# Altium PCB Karta_TETRA.PCBDOC (part 8 of 8)
Units mm, origin at the board's own origin, x right, y up, seen from the top; angles counter-clockwise.
Board outline 70 x 83.2 mm, 6 copper layers (TopLayer, Layer 1, Layer 2, Layer 3, Layer 4, Bottom Layer), stack 0.914 mm thick; 344 components, 222 nets, 1133 pads, 615 vias.
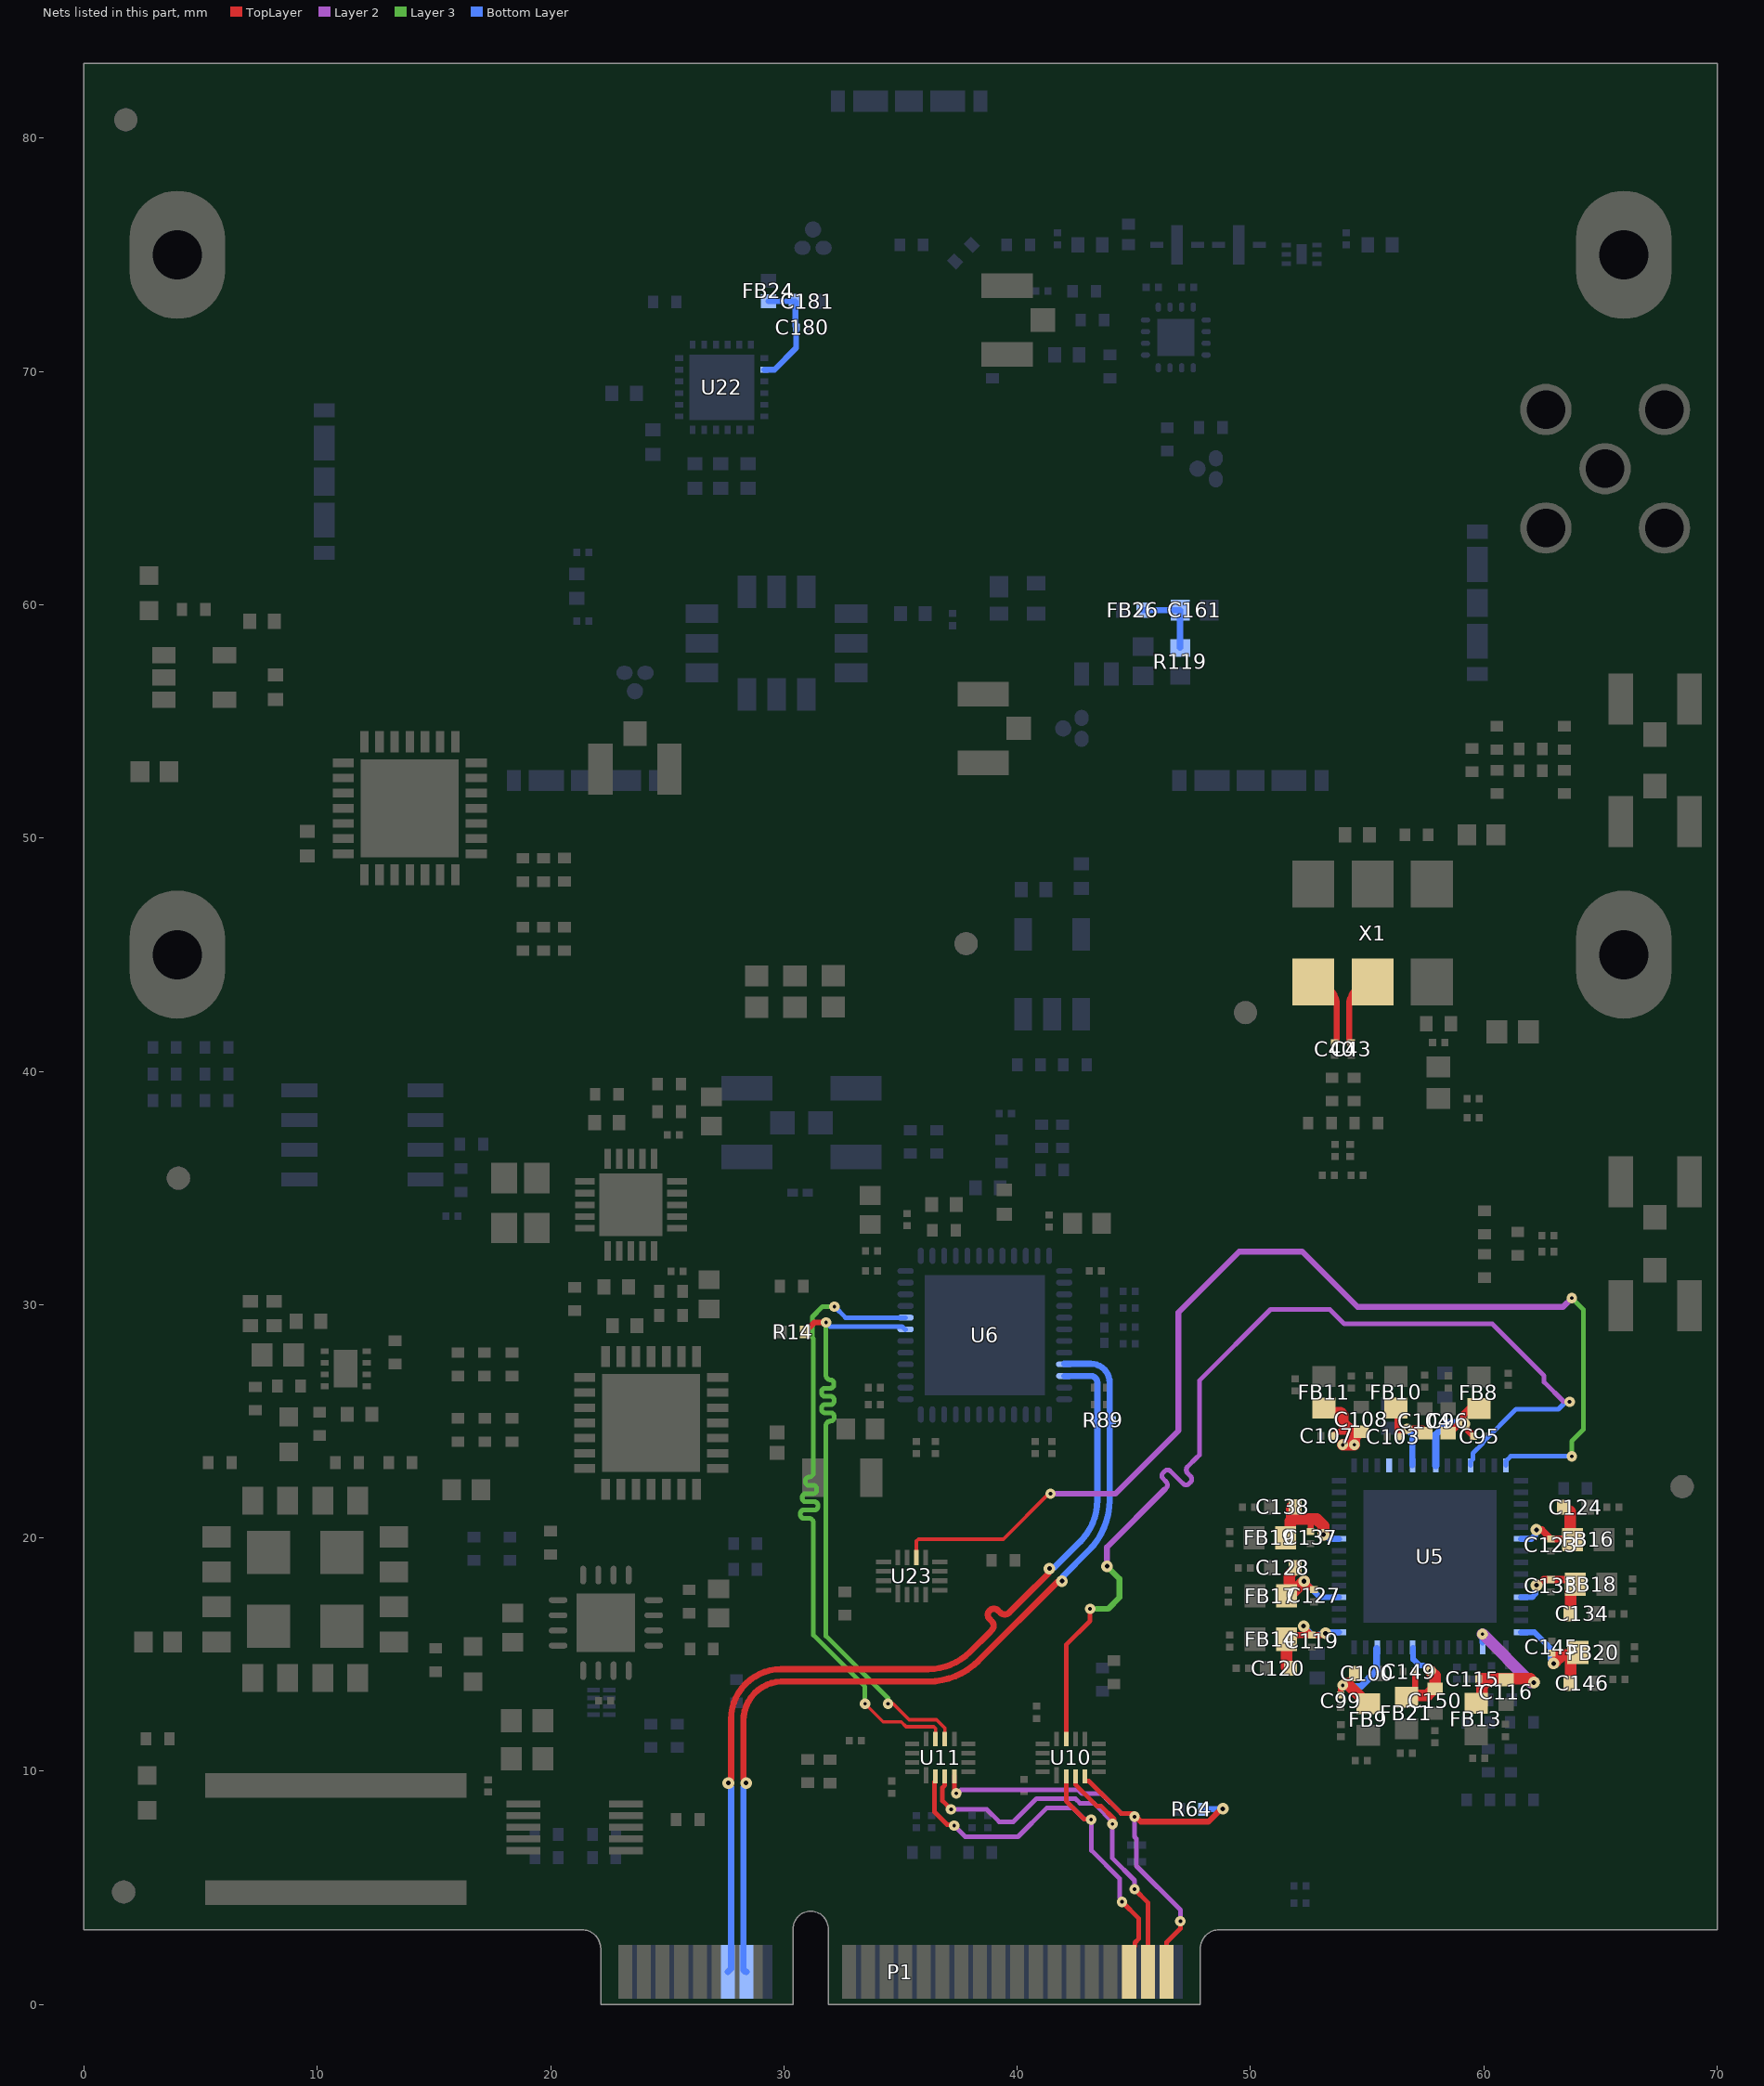
[diagram p9: the nets of this part, all layers, seen from the top]

## Via types
v1: diameter 0.5, hole 0.2, TopLayer to Bottom Layer, tented both sides, 402 vias
v2: diameter 0.45, hole 0.15, TopLayer to Bottom Layer, tented both sides, 189 vias
v3: diameter 0.45, hole 0.15, TopLayer to Bottom Layer, 23 vias
v4: diameter 0.5, hole 0.2, TopLayer to Bottom Layer, 1 vias

## Nets (pads, with @x,y where several pads share a name; then routed paths per layer and width w, separated by ;. In a path a pad name is that pad's centre, name@x,y a point inside that pad or via, vN(x,y) a via of type N, cw(c..) or ccw(c..) an arc to the next point about the centre after c; other vN are vias at no path point) (continued)
SPI_MISO_LTC: R14.1 U6.43 U11.10 | length 27.4
  TopLayer w0.15: v3(34.463,12.892) 34.679,12.892 35.367,12.204 36.545,12.204 36.9,11.849 U11.10@36.9,11.379
  TopLayer w0.25: R14.1@30.899,28.832 31.304,29.237 v2(31.804,29.237)
  Layer 3 w0.2: v2(31.804,29.237) 31.803,28.241 31.803,26.972 ccw(c32.003,26.972) 32.003,26.772 cw(c32.003,26.631) 32.144,26.631 32.144,26.561 cw(c32.003,26.561) 32.003,26.42 31.761,26.42 ccw(c31.761,26.279) 31.62,26.279 31.62,26.208 ccw(c31.761,26.208) 31.761,26.067 32.011,26.067 cw(c32.011,25.926) 32.152,25.926 32.152,25.856 cw(c32.011,25.856) 32.011,25.715 31.759,25.715 ccw(c31.759,25.574) 31.618,25.574 31.618,25.503 ccw(c31.759,25.503) 31.759,25.362 32.011,25.362 cw(c32.011,25.221) 32.152,25.221 32.152,25.151 cw(c32.011,25.151) 32.011,25.01 32.003,25.01 ccw(c32.003,24.81) 31.803,24.81 31.803,24.358 31.803,15.792 34.463,13.131 v3(34.463,12.892)
  Bottom Layer w0.2: v2(31.804,29.237) 31.974,29.067 35.064,29.067 35.203,28.928 U6.43@35.217,28.942
SPI_MISO_MB: P1.49 U10.3 U11.3 | length 19.6
  TopLayer w0.2: U11.3@36.9,9.779 36.9,9.392 36.8,9.292 36.8,8.731 v2(37.165,8.366) ; U10.3@42.495,9.779 42.495,9.425 43.408,8.513 43.589,8.513 44.153,7.949 44.081,7.877 v3(44.081,7.742) ; v2(45.027,4.946) 45.6,4.373 P1.49@45.6,1.4
  Layer 2 w0.2: v2(37.165,8.366) 38.694,8.366 39.224,7.835 39.833,7.835 40.823,8.826 42.492,8.826 42.686,8.632 43.293,8.632 44.153,7.772 44.122,7.742 v3(44.081,7.742) 44.081,6.268 45.027,5.323 v2(45.027,4.946)
SPI_MOSI_LMK: U5.11 U10.11 | length 45
  TopLayer w0.2: U10.11@42.095,11.379 42.095,15.419 43.124,16.447 v3(43.124,16.962)
  Layer 2 w0.2: v3@43.068,16.962 v3(43.124,16.962) ; 46.309,22.059 46.38,22.13 ccw(c46.238,22.271) 46.38,22.413 46.255,22.537 cw(c46.384,22.665) 46.255,22.794 46.32,22.858 cw(c46.448,22.73) 46.576,22.858 47.108,22.326 ccw(c47.237,22.455) 47.365,22.326 47.429,22.39 ccw(c47.301,22.519) 47.429,22.647 47.305,22.772 cw(c47.446,22.913) 47.305,23.055 47.676,23.426 47.806,23.556 47.806,26.74 50.858,29.792 53.4,29.792 54.022,29.17 60.369,29.17 62.586,26.953 62.586,26.68 63.435,25.832 v3(63.678,25.832)
  Layer 2 w0.25: v1(43.848,18.787) 43.848,19.603 46.304,22.059 46.309,22.059
  Layer 3 w0.25: v3(43.124,16.962) 43.899,16.962 44.384,17.448 44.384,18.25 v1(43.848,18.787)
  Bottom Layer w0.2: U5.11@59.443,23.106 59.443,23.286 59.529,23.373 59.529,23.627 59.96,24.058 59.96,24.099 61.38,25.519 63.198,25.519 63.511,25.832 v3(63.678,25.832)
SPI_MOSI_LTC: U6.44 U11.11 | length 28.4
  TopLayer w0.15: v3(33.477,12.892) 34.251,12.117 35.029,12.117 35.242,11.904 36.42,11.904 36.5,11.824 U11.11@36.5,11.379
  Layer 3 w0.2: v2(32.168,29.912) 31.65,29.912 31.219,29.48 31.219,28.589 31.268,28.54 31.268,24.104 31.268,22.806 cw(c31.068,22.806) 31.068,22.606 ccw(c31.068,22.465) 30.927,22.465 30.927,22.394 ccw(c31.068,22.394) 31.068,22.253 31.268,22.253 cw(c31.268,22.112) 31.409,22.112 31.409,22.042 cw(c31.268,22.042) 31.268,21.901 30.932,21.901 ccw(c30.932,21.76) 30.791,21.76 30.791,21.689 ccw(c30.932,21.689) 30.932,21.548 31.312,21.548 cw(c31.312,21.407) 31.453,21.407 31.453,21.337 cw(c31.312,21.337) 31.312,21.196 30.852,21.196 ccw(c30.852,21.055) 30.711,21.055 30.711,20.985 ccw(c30.852,20.985) 30.852,20.844 31.068,20.844 cw(c31.068,20.644) 31.268,20.644 31.268,20.544 31.268,15.832 33.477,13.623 v3(33.477,12.892)
  Bottom Layer w0.2: v2(32.168,29.912) 32.174,29.912 32.643,29.442 U6.44@35.217,29.442
SPI_MOSI_MB: P1.47 U10.2 U11.2 | length 19.4
  TopLayer w0.2: U11.2@36.5,9.779 36.5,9.579 36.45,9.529 36.45,8.254 36.987,7.716 37.251,7.716 v2(37.299,7.668) ; U10.2@42.095,9.779 42.095,8.728 42.873,7.95 43.148,7.95 v3(43.17,7.928) ; v2(44.494,4.402) 45.216,3.68 45.216,2.82 45.05,2.654 45.05,2.5 44.8,2.25 P1.47@44.8,1.4
  Layer 2 w0.2: v2(37.299,7.668) 37.776,7.191 40.033,7.191 41.261,8.419 42.404,8.419 42.873,7.95 43.066,7.95 43.089,7.928 v3(43.17,7.928) ; v3@43.183,7.95 43.183,6.601 44.384,5.4 44.384,4.566 44.494,4.456 v2(44.494,4.402)
SPI_nCS_1_MB: P1.51 R64.2 U10.4 U11.4 | length 24.6
  TopLayer w0.2: U11.4@37.3,9.779 37.3,9.173 37.385,9.088 v2(37.385,9.049) ; U10.4@42.895,9.779 42.895,9.579 43.072,9.579 44.46,8.191 44.888,8.191 v3(45.027,8.052) ; P1.51@46.4,1.4 46.4,2.665 46.995,3.26 v2(46.995,3.569)
  TopLayer w0.25: v3(45.027,8.052) 45.081,8.052 45.298,7.835 48.197,7.835 48.751,8.39 v1(48.815,8.39)
  Layer 2 w0.2: v2(37.385,9.049) 37.453,9.049 37.595,9.192 42.621,9.192 42.777,9.036 43.615,9.036 44.46,8.191 44.888,8.191 v3(45.027,8.052) 45.027,7.191 45.11,7.107 45.11,5.939 46.995,4.054 v2(46.995,3.569)
  Bottom Layer w0.25: R64.2@47.981,8.366 47.993,8.378 48.802,8.378 v1(48.815,8.39)
Sync_04610: U5.14 U23.10 | length 48.3
  TopLayer w0.15: U23.10@35.677,19.164 35.677,19.861 35.765,19.949 39.407,19.949 41.349,21.892 v2(41.431,21.892)
  Layer 2 w0.25: v2(41.431,21.892) 44.206,21.892 46.912,24.598 46.912,29.67 49.516,32.273 52.216,32.273 54.588,29.902 63.394,29.902 v2(63.775,30.282)
  Layer 3 w0.2: v2(63.775,23.499) 63.775,24.151 64.263,24.639 64.263,29.795 v2(63.775,30.282)
  Bottom Layer w0.2: U5.14@60.943,23.106 60.943,23.286 61.156,23.499 v2(63.775,23.499)
SYNC_N: P1.12 R89.1 U6.22 | length 38.9
  TopLayer w0.268: v1(27.62,9.491) 27.62,9.554 27.736,9.67 27.736,12.231 cw(c29.878,12.231) 29.878,14.373 36.181,14.373 ccw(c36.181,16.913) 37.977,15.117 38.815,15.954 38.909,16.049 ccw(c38.72,16.238) 38.909,16.428 38.817,16.52 cw(c39.002,16.705) 38.817,16.889 cw(c39.002,16.705) 39.186,16.889 39.279,16.797 ccw(c39.468,16.987) 39.658,16.797 40.26,17.4 41.337,18.476 41.337,18.64 v1(41.381,18.685)
  Bottom Layer w0.268: P1.12@27.6,1.4 27.736,1.536 27.736,9.312 27.62,9.428 v1(27.62,9.491) ; v1(41.381,18.685) 41.425,18.729 41.589,18.729 42.689,19.829 ccw(c40.893,21.625) 43.433,21.625 43.433,26.66 ccw(c43.153,26.66) 43.153,26.941 U6.22@42.017,26.942
SYNC_P: P1.14 R89.2 U6.21 | length 38.8
  TopLayer w0.268: v1(28.38,9.491) 28.38,9.554 28.264,9.67 28.264,12.165 cw(c29.945,12.165) 29.887,13.845 36.184,13.845 ccw(c36.184,16.906) 38.349,14.741 41.71,18.103 41.874,18.103 v1(41.918,18.147)
  Bottom Layer w0.268: v1(28.38,9.491) 28.38,9.428 28.264,9.312 28.264,1.536 ccw(c28.4,1.536) P1.14@28.4,1.4 ; v1(41.918,18.147) 41.963,18.192 41.963,18.356 43.065,19.457 ccw(c40.9,21.622) 43.961,21.622 43.961,26.66 ccw(c43.153,26.66) 43.153,27.469 U6.21@42.017,27.469
Vcc_5V_AMP_1: C161.1 FB26.2 R119.2 | length 3.2
  Bottom Layer w0.268: FB26.2@45.404,59.768 C161.1@46.983,59.768 ; R119.2@46.983,58.152 C161.1@46.983,59.768 ; C161.1@46.988,59.768 C161.1@46.983,59.768
Vcc_5V_ATT_1: C180.2 C181.2 FB24.2 U22.2 | length 4.9
  Bottom Layer w0.25: U22.2@29.164,70.074 29.594,70.074 30.526,71.006 C180.2@30.526,71.887 30.526,71.897 30.49,71.933 C181.2@30.49,73.006 30.487,73.008 29.342,73.008 FB24.2@29.339,73.011
VCXO_OUT_N: C43.2 X1.5 | length 3.2
  TopLayer w0.268: C43.2@54.323,41.215 cw(c54.323,41.31) 54.227,41.31 54.227,42.823 cw(c55.233,42.823) X1.5@55.233,43.829
VCXO_OUT_P: C40.2 X1.4 | length 3.2
  TopLayer w0.268: X1.4@52.693,43.829 cw(c52.693,42.823) 53.699,42.823 53.699,41.304 cw(c53.61,41.304) C40.2@53.61,41.215
VDD_CORE: C95.2 C96.2 FB8.2 U5.8 | length 4.3
  TopLayer w0.3: C96.2@58.648,24.615 58.885,24.853 59.133,24.853 v1(59.171,24.891) ; v1@59.104,24.921 59.104,25.263 59.404,25.563 FB8.2@59.454,25.563 ; 59.319,24.612 59.566,24.365 C95.2@59.566,24.355
  Bottom Layer w0.3: U5.8@57.943,23.106 57.943,24.426 58.472,24.956 58.828,24.956 58.848,24.976
VDD_IO: C115.2 C116.2 FB13.2 U5.31 | length 6.9
  TopLayer w0.5: FB13.2@59.671,12.915 59.721,12.915 59.921,13.115 59.921,13.643 60.127,13.85 ; C115.2@59.895,13.959 61.99,13.959 v1(62.144,13.805)
  Layer 2 w0.5: v2(59.943,15.877) 62.015,13.805 v1(62.144,13.805)
  Bottom Layer w0.25: U5.31@59.943,15.521 v2(59.943,15.877)
VDD_OSC: C149.2 C150.2 FB21.2 U5.37 | length 4.9
  TopLayer w0.25: FB21.2@56.684,13.167 56.729,13.167 57.054,13.492 C149.2@57.054,14.273
  TopLayer w0.5: FB21.2@56.684,13.167 56.773,13.256 57.584,13.256 57.859,13.531 C150.2@57.909,13.531 57.909,14.1 v2(57.708,14.301)
  Bottom Layer w0.25: U5.37@56.97,15.279 56.97,14.806 57.244,14.533 57.422,14.533 57.654,14.301 v2(57.708,14.301)
VDD_PLL1: C99.2 C100.2 FB9.2 U5.40 | length 4.9
  TopLayer w0.25: C99.2@53.864,13.262 v2@53.864,13.538 ; v2(53.955,13.683) 53.993,13.721 54.071,13.721 54.121,13.772 54.49,14.14 C100.2@54.49,14.19
  TopLayer w0.5: v2@54.121,13.772 54.999,12.894 FB9.2@55.049,12.894
  Bottom Layer w0.3: v2@54.045,13.636 54.72,13.636 55.399,14.315 U5.40@55.399,15.263
VDD_PLL2CORE: C103.2 C104.2 FB10.2 U5.6 | length 3.9
  TopLayer w0.25: FB10.2@56.234,25.563 56.292,25.505 56.292,24.504 ; C103.2@56.384,24.352 v2@56.722,24.69 ; v2@56.724,24.688 C104.2@57.383,24.688
  Bottom Layer w0.25: v2(56.724,24.682) 56.724,24.642 56.943,24.423 U5.6@56.943,23.106
VDD_PLL2OSC: C107.2 C108.2 FB11.2 U5.4 | length 4.3
  TopLayer w0.25: C107.2@53.536,24.372 53.536,24.382 53.561,24.407 53.571,24.407 53.717,24.553 54.332,24.553 54.704,24.553 C108.2@54.754,24.553
  TopLayer w0.5: FB11.2@53.151,25.569 53.351,25.369 53.855,25.369 53.947,25.276 53.947,24.938 54.332,24.553 ; v2(53.951,23.989) 54.443,23.989 v2(54.447,23.992) 54.447,24.296 C108.2@54.704,24.553
VDDO_1/2: C123.2 C124.2 FB16.2 U5.20 | length 3.9
  TopLayer w0.3: v1(62.255,20.345) 62.479,20.345 62.874,19.95 C123.2@62.884,19.96 FB16.2@63.775,19.96
  TopLayer w0.5: C124.2@63.675,21.145 63.68,21.145 63.7,21.125 63.7,20.035 63.775,19.96 FB16.2@63.806,19.928
  Bottom Layer w0.25: U5.20@61.593,19.956 62.04,19.956 62.208,20.123 62.208,20.298 v1(62.255,20.345)
VDDO_3/4: C133.2 C134.2 FB18.2 U5.25 | length 4.3
  TopLayer w0.3: v1(62.26,17.968) 62.314,17.968 62.56,18.214 FB18.2@63.725,18.214
  TopLayer w0.5: C134.2@63.719,16.751 63.719,17.678 63.724,17.684 63.724,17.814 FB18.2@63.924,18.014 FB18.2@63.725,18.214
  Bottom Layer w0.25: U5.25@61.593,17.456 62.068,17.456 62.214,17.603 62.214,17.922 v1(62.26,17.968)
VDDO_5: C145.2 C146.2 FB20.2 U5.28 | length 5.1
  TopLayer w0.25: C145.2@62.911,15.064 63.236,15.064
  TopLayer w0.5: v1(62.987,14.615) 63.236,14.864 ; 63.236,14.977 63.918,14.977 FB20.2@64.029,15.088 FB20.2@63.84,14.899 ; C146.2@63.722,13.824 FB20.2@63.722,14.899
  Bottom Layer w0.25: U5.28@61.593,15.956 62.172,15.956 62.862,15.266 62.862,14.808 62.987,14.683 v1(62.987,14.615)
VDDO_6: C119.2 C120.2 FB14.2 U5.43 | length 5.3
  TopLayer w0.25: FB14.2@51.547,15.657 51.725,15.836 C119.2@52.624,15.836 ; v1(52.277,16.216) 52.277,16.182 C119.2@52.624,15.836 ; v1(53.217,15.911) 53.149,15.911 53.073,15.836 C119.2@52.634,15.836 C119.2@52.624,15.836
  TopLayer w0.5: FB14.2@51.547,15.657 51.565,15.639 51.565,15.176 51.54,15.151 51.54,14.458 C120.2@51.584,14.414
  Bottom Layer w0.25: v1(52.277,16.216) 52.658,15.836 52.916,15.836 52.943,15.863 53.169,15.863 v1(53.217,15.911) 53.257,15.951 53.788,15.951 U5.43@53.793,15.956
VDDO_7/8: C127.2 C128.2 FB17.2 U5.46 | length 4.3
  TopLayer w0.25: v1@52.235,18.211 C127.2@52.661,17.784
  TopLayer w0.5: FB17.2@51.67,17.638 51.67,18.43 51.908,18.668 C128.2@51.908,18.718 ; FB17.2@51.794,17.643 v1(52.296,18.145)
  Bottom Layer w0.25: v1(52.296,18.145) 52.984,17.456 U5.46@53.793,17.456
VDDO_9/10: C137.2 C138.2 FB19.2 U5.51 | length 4.6
  TopLayer w0.25: C137.2@52.576,20.269 52.576,20.811
  TopLayer w0.5: FB19.2@51.5,20.009 51.7,20.209 51.7,20.72 51.764,20.784 ; C138.2@51.778,21.323 51.764,21.309 51.764,20.784 ; v1(53.128,20.14) 53.128,20.518 52.835,20.811 52.576,20.811 51.792,20.811 51.764,20.784
  Bottom Layer w0.25: v1(53.128,20.14) 53.195,20.14 53.379,19.956 U5.51@53.793,19.956
pads on no net: FID1.0 FID2.0 FID3.0 FID4.0 FID5.0 FID6.0 T2.2 U3.6 U5. U5.1 U5.2 U5.3 U5.18 U5.19 U5.23 U5.24 U5.35 U5.36 U5.44 U5.45 U5.47 U5.48 U5.52 U5.53 U5.56 U6.27 U6.28 U6.33 U6.34 U7.7 U7.10 U7.15 U7.16 U7.17 U7.18 U7.19 U7.20 U7.21 U7.22 U7.23 U7.24 U8.4 U8.7 U8.10 U8.15 U8.26 U12.2 U12.6 U12.8 U12.9 U12.10 U14.8 U23.5 U23.14 U23.15 X1.2

## Polygon pours and split planes (outlines as drawn)
GND_VCXO on TopLayer "GND_VCXO_L01_P056" (solid, remove dead copper, pour order 56): 51.373,50.487 51.711,50.826 54.616,50.826 54.616,49.247 54.559,49.19 53.986,49.19 53.986,47.006 54.392,46.6 61.158,46.6 61.158,40.636 58.553,40.636 58.248,40.941 58.248,42.529 58.831,42.529 58.971,42.67 58.971,45.372 51.822,45.372 51.373,45.82
4610_FINE_3V3 on TopLayer "4610_FINE_3V3_L01_P040" (solid, remove dead copper, pour order 40): 56.424,39.736 59.648,39.736 59.648,35.87 56.424,35.87
3V6_DCDC on TopLayer "3V6_DCDC_L01_P193" (solid, remove dead copper, pour order 193): 18.251,37.855 18.251,36.774 18.786,36.268 18.786,32.574 18.595,32.383 14.205,32.383 11.815,29.993 11.815,23.734 13.053,23.734 13.053,21.973 12.685,21.605 12.685,14.768 12.785,14.668 19.437,14.668 19.437,15.809 20.658,15.809 20.723,15.744 21.123,16.144 21.123,17.609 21.404,17.889 22.4,17.889 22.4,18.97 21.849,19.494 19.799,19.494 15.559,23.734 15.559,28.498 17.346,30.285 20.002,30.285 21.895,32.178 21.895,36.928 20.323,38.5 18.385,38.5 18.251,38.367
12V on TopLayer "12V_L01_P192" (solid, remove dead copper, pour order 192): 5.834,24.333 5.857,21.204 6.285,20.776 6.285,12.574 7.79,11.069 15.841,11.084 16.389,10.536 16.389,8.865 4.688,8.865 3.209,10.344 3.209,16.772 2.689,17.274 2.689,24.333
SPI_1V8_ADC on TopLayer "SPI_1V8_ADC_L01_P185" (solid, remove dead copper, pour order 185): 22.453,19.759 22.944,20.249 26.892,20.249 28.984,22.342 28.984,23.595 29.575,24.186 31.876,24.186 32.171,23.891 32.171,22.294 32.171,21.589 32.171,19.149 30.267,17.244 29.019,17.25 cw(c28.925,18.21) 28.925,17.245 25.379,17.245 ccw(c25.379,17.041) 25.174,17.041 25.174,16.044 cw(c24.793,16.044) 24.793,15.663 24.387,15.663 cw(c24.387,16.027) 24.023,16.027 24.023,17.334 ccw(c23.748,17.334) 23.748,17.609 22.817,17.609 cw(c22.817,17.973) 22.453,17.973
4610_FINE_3V3 on TopLayer "4610_FINE_3V3_L01_P076" (solid, remove dead copper, pour order 76): 27.298,38.094 27.425,37.967 27.425,34.803 27.238,34.616 26.383,34.62 cw(c26.294,35.516) 26.294,34.616 25.174,34.616 cw(c25.174,34.838) 24.952,34.838 24.952,36.08 cw(c25.103,36.08) 25.103,36.231 ccw(c25.103,36.331) 25.174,36.26 ccw(c25.174,36.433) 25.346,36.433 25.346,38.094
PGND on TopLayer "PGND_L01_P200" (solid, remove dead copper, pour order 200): 3.161,9.451 5.085,7.527 5.085,4.265 16.389,4.265 16.389,5.784 24.584,5.784 24.584,2.59 22.413,2.59 21.803,3.2 0,3.2 0,17.119 2.55,17.119 3.161,16.509
3V3_MB on TopLayer "3V3_MB_L01_P190" (solid, remove dead copper, pour order 190): 36.2,11.279 34.113,11.279 33.499,10.665 33.499,9.532 33.94,9.091 36.2,9.091
2122_VCC on TopLayer "2122_VCC_L01_P188" (solid, pour order 188): 28.49,24.101 28.097,24.494 28.097,26.059 30.588,26.059 30.707,25.939 30.707,24.32 30.488,24.101
2122_0VDD on TopLayer "2122_0VDD_L01_P165" (solid, pour order 165): 35.31,25.868 35.1,25.658 35.1,24.454 35.677,23.877 36.762,23.877 37.057,24.172 37.057,25.582 36.696,25.934 ccw(c36.608,25.494) 36.608,25.942 35.383,25.942
2122_0VDD on TopLayer "2122_0VDD_L01_P163" (solid, pour order 163): 42,24.937 ccw(c41.295,24.937) 41.295,25.642 40.867,25.642 ccw(c40.867,25.017) 40.242,25.017 40.242,24.202 ccw(c40.535,24.202) 40.535,23.909 41.682,23.909 ccw(c41.682,24.227) 42,24.227
SPI_1V8_CLK on TopLayer "SPI_1V8_CLK_L01_P057" (solid, remove dead copper, pour order 57): 39.465,12.515 41.395,12.506 41.395,11.043 39.465,11.043
2122_0VDD on TopLayer "2122_0VDD_L01_P053" (solid, remove dead copper, pour order 53): 33.049,24.213 35.377,24.213 35.377,21.163 33.049,21.163
2122_VCC on TopLayer "2122_VCC_L01_P050" (solid, remove dead copper, pour order 50): 33.716,27.007 34.884,27.007 35.1,26.791 35.1,24.03 35.027,23.957 33.576,23.957 33.274,24.258 33.274,25.08 33.54,25.346 33.681,25.346 33.885,25.55 33.885,26.627 33.709,26.802
3V3_MB on TopLayer "3V3_MB_L01_P041" (solid, remove dead copper, pour order 41): 41.393,10.881 39.429,10.881 39.063,10.515 39.063,9.584 39.258,9.389 41.506,9.389 41.595,9.479 41.595,10.679
3V3_DIGIT on TopLayer "3V3_DIGIT_L01_P191" (solid, remove dead copper, pour order 191): 8.061,29.735 8.061,25.875 6.234,25.875 6.234,29.735
GND on TopLayer "GND_L01_P203" (solid, remove dead copper, pour order 203): 11.06,22.433 11.06,20.494 12.583,20.494 12.584,20.49 12.584,12.846 6.528,12.846 6.528,20.559 7.881,20.559 7.881,22.433
2122_VCC on TopLayer "2122_VCC_L01_P178" (solid, pour order 178): 41.476,33.495 ccw(c41.476,33.817) 41.797,33.817 cw(c42.269,33.817) 42.269,34.288 42.714,34.288 cw(c42.714,33.867) 43.134,33.867 43.134,32.383 ccw(c43.294,32.383) 43.294,32.223 cw(c43.294,32.069) 43.448,32.069 43.448,31.327 cw(c43.198,31.327) 43.198,31.077 41.711,31.077 cw(c41.711,31.54) 41.247,31.54 41.247,32.128 ccw(c40.961,32.128) 40.961,32.415 cw(c40.961,32.628) 40.747,32.628 40.747,33.388 cw(c40.854,33.388) 40.854,33.495
2122_VCC on TopLayer "2122_VCC_L01_P161" (solid, pour order 161): 41.5,26.788 43.212,26.788 cw(c43.212,26.567) 43.433,26.567 43.433,25.625 cw(c43.1,25.625) 43.1,25.292 41.717,25.292 cw(c41.717,25.517) 41.492,25.517
2122_VCC on TopLayer "2122_VCC_L01_P052" (solid, remove dead copper, pour order 52): 33.255,32.858 33.649,32.463 33.644,31.282 33.892,31.035 35.387,31.035 36.067,31.716 36.067,32.37 36.967,32.37 36.967,33.828 34.372,33.828 33.255,33.828
SPI_1V8_CLK on TopLayer "SPI_1V8_CLK_L01_P048" (solid, remove dead copper, pour order 48): 25.046,30.091 24.995,30.142 24.995,33.697 cw(c25.217,33.697) 25.217,33.919 26.338,33.919 cw(c26.338,33.019) 27.238,33.019 27.238,30.456 26.873,30.091
GND on Layer 1 "GND_L02_P204" (solid, remove dead copper, pour order 204): 70,3.2 70,83.2 0,83.2 0,3.2
PGND on Layer 1 "PGND_L02_P177" (solid, remove dead copper, pour order 177): 6.05,34.925 0,34.925 0,3.2 22.276,3.2 23.997,3.2 23.997,6.122 22.834,7.285 18.974,11.145 6.05,11.145
4610_FINE_3V3 on Layer 2 "4610_FINE_3V3_L03_P087" (solid, pour order 87): 59.024,27.119 59.024,26.006 cw(c58.022,26.006) 58.022,25.004 ccw(c58.022,24.259) 57.277,24.259 57.277,12.167 cw(c55.384,12.167) 55.384,10.275 53.157,10.275 cw(c53.157,10.625) 52.807,10.625 52.807,12.802 cw(c52.934,12.802) 52.934,12.929 ccw(c52.934,13.03) 53.035,13.03 53.035,25.07 ccw(c52.527,25.07) 52.527,25.578 51.785,25.578 cw(c51.785,25.928) 51.435,25.928 51.437,26.163 cw(c51.562,26.187) 51.435,26.187 51.435,27.915 cw(c52.213,27.915) 52.213,28.692 57.566,28.692 cw(c57.566,27.229) 59.03,27.229 cw(c57.913,27.229)
2122_VCC on Layer 2 "2122_VCC_L03_P079" (solid, pour order 79): 28.53,25.804 cw(c29.243,25.804) 29.243,26.516 31.559,26.516 ccw(c31.559,27.343) 32.386,27.343 32.386,34.626 cw(c33.088,34.626) 33.088,35.328 33.907,35.323 cw(c33.996,34.421) 33.996,35.328 44.761,35.328 cw(c44.761,34.699) 45.39,34.699 45.39,25.645 cw(c44.564,25.645) 44.564,24.819 42.669,24.819 cw(c42.669,26.058) 41.431,26.058 41.431,30.74 ccw(c40.619,30.74) 40.619,31.552 35.509,31.552 ccw(c35.509,30.965) 34.922,30.965 34.922,24.359 cw(c34.439,24.359) 34.439,23.876 30.886,23.876 cw(c30.886,24.994) 30.777,23.881 ccw(c30.57,23.878) 30.567,24.085 28.593,24.085 cw(c28.593,24.358) 28.321,24.358 28.321,25.298 cw(c29.035,25.298)
2122_0VDD on Layer 2 "2122_0VDD_L03_P095" (solid, pour order 95): 33.368,23.559 34.566,23.559 ccw(c34.566,24.017) 35.024,24.017 35.024,25.067 cw(c35.677,25.067) 35.677,25.719 36.692,25.719 cw(c36.692,25.429) 36.982,25.429 36.982,24.142 cw(c34.442,24.142) 34.442,21.602 33.572,21.602 cw(c33.572,21.806) 33.368,21.806
no net on Layer 2 "NONET_L03_P093" (solid, pour order 93): 29.362,24.232
no net on Layer 2 "NONET_L03_P058" (solid, pour order 58): 24.765,28.905
SPI_1V8_CLK on Layer 3 "SPI_1V8_CLK_L04_P078" (solid, remove dead copper, pour order 78): 45.187,9.54 ccw(c47.727,9.54) 47.727,7 64.668,7 ccw(c64.668,9.54) 67.208,9.54 67.208,10.365 67.208,12.573 67.208,20.98 ccw(c66.472,20.98) 66.472,21.717 64.789,21.717 ccw(c64.789,21.292) 64.364,21.292 64.364,15.243 cw(c62.586,15.243) 62.586,13.466 52.58,13.466 cw(c52.58,14.935) 51.11,14.935 51.11,32.122 ccw(c49.194,32.145) 49.217,34.061 25.324,34.061 25.044,34.036 25.044,30.582 ccw(c25.298,30.582) 25.298,30.328 28.448,30.328 cw(c28.45,27.852) 28.593,30.323 42.647,30.323 cw(c42.647,27.784) 45.187,27.783 45.186,21.336 cw(c43.09,21.29) 45.187,21.285
4610_FINE_3V3 on Layer 3 "4610_FINE_3V3_L04_P089" (solid, pour order 89): 18.227,37.735 cw(c20.767,37.735) 20.767,40.275 59.919,40.275 cw(c59.919,37.735) 62.459,37.735 62.459,34.5 62.459,27.33 cw(c61.265,27.33) 61.265,26.137 55.202,26.137 cw(c55.202,28.677) 52.662,28.677 52.662,33.165 ccw(c51.562,33.165) 51.562,34.265 25.247,34.265 ccw(c25.247,31.725) 22.707,31.725 22.707,30.011 cw(c22.276,30.011) 22.276,29.58 20.767,29.58 cw(c20.767,32.119) 18.227,32.12
2122_0VDD on Layer 3 "2122_0VDD_L04_P120" (solid, remove dead copper, pour order 120): 35.166,25.753 35.166,23.965 35.403,23.728 42.177,23.728 42.255,23.806 42.255,25.685 42.067,25.873 39.581,25.873 35.286,25.873
no net on Layer 3 "NONET_L04_P083" (solid, pour order 83): 51.486,25.425
no net on Layer 3 "NONET_L04_P082" (solid, pour order 82): 51.79,27.965
2122_VCC on Bottom Layer "2122_VCC_L06_P097" (solid, pour order 97): 44.104,25.742 43.929,25.567 41.603,25.567 41.504,25.666 41.504,26.792 44.038,26.792 44.104,26.727
VDD_CORE on Bottom Layer "VDD_CORE_L06_P107" (solid, pour order 107): 59.888,25.477 59.888,24.631 59.563,24.306 59.16,24.287 58.504,24.287 ccw(c58.504,23.845) 58.063,23.845 58.063,22.806 57.823,22.806 57.823,24.306 59.122,25.606 59.442,25.602 59.763,25.602
2122_VCC on Bottom Layer "2122_VCC_L06_P167" (solid, remove dead copper, pour order 167): 35.217,26.567 35.145,26.64 33.896,26.64 33.782,26.526 33.782,25.243 33.66,25.121 33.66,24.216 33.7,24.176 34.987,24.176 35.094,24.283 35.094,25.653 35.167,25.726 35.505,25.726 35.567,25.789 35.567,26.442 ccw(c35.442,26.442) 35.442,26.567
PGND on Bottom Layer "PGND_L06_P045" (solid, remove dead copper, pour order 45): 16.986,5.61 18.02,4.575 24.274,4.575 24.274,7.929 19.045,7.929 19.045,12.762 18.961,12.846 4.788,12.846 4.431,13.203 4.431,30.8 3.477,31.754 0.33,31.754 0.33,31.706 0,31.376 0,3.2 4.431,3.2 4.431,5.61
3V3_MB on Bottom Layer "3V3_MB_L06_P073" (solid, remove dead copper, pour order 73): 22.249,13.237 22.384,13.372 23.669,13.372 23.669,12.888 23.569,12.788 22.343,12.788 22.249,12.881
+12 on Bottom Layer "+12_L06_P183" (solid, remove dead copper, pour order 183): 24.7,2.75 24.7,5.184 24.274,5.61 5.113,5.61 4.642,5.139 4.642,3.384 4.724,3.302 20.701,3.302 21.817,3.302 22.158,2.75
3V3_DIGIT on Bottom Layer "3V3_DIGIT_L06_P184" (solid, remove dead copper, pour order 184): 19.025,12.781 19.025,13.742 20.625,13.742 20.774,13.593 22.249,13.593 22.249,12.881 19.56,12.881 19.46,12.781
2122_VCC on Bottom Layer "2122_VCC_L06_P101" (solid, pour order 101): 34.963,33.774 cw(c34.963,33.394) 35.343,33.394 ccw(c35.613,33.394) 35.613,33.124 35.623,33.124 cw(c35.623,32.505) 36.242,32.505 36.242,32.031 cw(c35.263,32.031) 35.263,31.052 34.07,31.052 cw(c34.07,31.455) 33.666,31.455 33.666,32.476 33.671,32.476 33.671,32.552 ccw(c33.481,32.552) 33.481,32.742 cw(c33.481,32.946) 33.276,32.946 33.276,33.841 ccw(c33.343,33.841) 33.343,33.774
VDD_PLL2OSC on Bottom Layer "VDD_PLL2OSC_L06_P077" (solid, remove dead copper, pour order 77): 53.073,25.444 54.684,25.444 55.193,24.935 55.193,24.561 55.663,24.091 55.894,24.091 56.063,23.922 56.063,22.806 55.823,22.806 55.823,23.427 55.643,23.606 53.603,23.606 53.078,24.131 53.078,24.176
2122_VCC on Bottom Layer "2122_VCC_L06_P099" (solid, pour order 99): 41.993,33.857 cw(c42.119,33.857) 42.119,33.983 42.814,33.983 cw(c42.811,33.665) 43.129,33.663 43.129,32.374 ccw(c43.289,32.374) 43.289,32.214 cw(c43.289,32.06) 43.443,32.06 43.443,31.317 cw(c43.193,31.317) 43.193,31.067 41.706,31.067 cw(c41.706,31.531) 41.242,31.531 41.242,32.119 ccw(c40.956,32.119) 41.237,32.175 41.237,33.062 cw(c41.378,33.062) 41.378,33.203 41.456,33.203 ccw(c41.456,33.74) 41.993,33.74
no net on Bottom Layer "NONET_L06_P199" (solid, remove dead copper, pour order 199): 56.823,15.606
no net on Bottom Layer "NONET_L06_P186" (solid, remove dead copper, pour order 186): 8.017,80.432
GND on Layer 4 "GND_L05_P209" (solid, remove dead copper, pour order 209): 6.274,11.43 6.317,11.387 13.201,11.387 15.117,9.471 20.704,9.471 24.917,5.257 24.917,2.54 30.023,2.54 30.29,2.808 30.29,3.925 30.531,4.166 31.674,4.166 31.977,3.862 31.977,2.922 32.334,2.565 47.219,2.565 47.853,3.2 70,3.2 70,43.072 62.631,43.072 8.248,43.072 6.274,41.097
GND_ATT on Layer 4 "GND_ATT_L05_P208" (solid, remove dead copper, pour order 208): 7.478,51.48 7.478,43.282 40.344,43.282 70,43.282 70,83.2 0,83.2 0,55.3 7.47,55.3
PGND on Layer 4 "PGND_L05_P210" (solid, remove dead copper, pour order 210): 7.087,70.028 7.087,42.495 5.928,41.336 5.928,12.865 7.141,11.652 12.684,11.652 15.079,9.257 20.472,9.257 24.917,4.808 24.917,2.54 22.839,2.54 22.179,3.2 0,3.2 0,70.028
no net on Layer 4 "NONET_L05_P173" (solid, remove dead copper, pour order 173): 33.985,43.282

## Keep-outs
KeepOutLayer:
  lines w0.1: 0,3.2 0,83.2 70,83.2 70,3.2 48.7,3.2 48.636,3.2 ccw(c48.636,2.414) 47.85,2.414 47.85,0 31.9,0 31.9,3.2 31.9,3.243 ccw(c31.149,3.243) 31.149,3.993 ccw(c31.149,3.244) 30.4,3.244 30.4,0 22.151,0 ccw(c22.151,-0.001) 22.15,-0.001 22.15,2.35 ccw(c21.3,2.35) 21.3,3.2 0,3.2

## Other copper
TopLayer:
  pour cut-out: 59.562,34.527 60.636,34.527 60.68,34.483 60.68,33.995 60.512,33.827 59.562,33.827
  pour cut-out: 59.562,31.446 60.636,31.446 60.68,31.402 60.68,30.914 60.512,30.746 59.562,30.746
  pour cut-out: 37.904,10.099 38.901,10.099 38.901,9.517 39.204,9.213 41.427,9.213 41.441,9.227 41.441,7.423 41.235,7.218 38.175,7.218 37.622,7.77 37.622,9.817
  pour cut-out: 33.477,9.029 35.507,9.029 35.668,8.868 35.668,6.85 33.584,6.85 33.477,6.957
Bottom Layer:
  pour cut-out: 19.705,5.869 21.869,5.869 22.163,6.163 22.163,8.102 21.997,8.029 20.258,8.029 19.783,7.555
  pour cut-out: 3.379,41.504 5.765,41.504 5.815,41.454 5.815,38.318 3.429,38.318 3.379,38.268

## Silkscreen, mask and mechanical layers (free items; w line width, h text height)
TopOverlay:
  drawing of 42 lines, arcs and shapes, not listed
Bottom Overlay:
  lines w0.1: 10.2,68.871 10.2,81.7 31.713,81.7 ; 10.217,61.6 10.217,52.368 10.278,52.368 17.755,52.368 ; 25.1,52.368 46.332,52.368 ; 38.948,81.7 59.722,81.7 59.722,63.772 ; 53.613,52.368 59.722,52.368 59.722,56.367
PCI-SIG Outline:
  lines w0.1: 21.35,3.2 cw(c21.35,2.4) 22.15,2.4 ; 21.35,3.2 cw(c21.35,2.4) 22.15,2.4 ; 21.35,3.2 0,3.2 0,83.2 70,83.2 70,3.2 48.659,3.2 ccw(c48.659,2.391) 47.85,2.391 47.85,2.119 47.85,0 31.9,0 31.9,3.236 ccw(c31.143,3.236) 31.143,3.994 ccw(c31.143,3.251) 30.4,3.251 30.4,0 22.15,0 22.15,2.4 ; 22.15,2.4 22.15,2.4